# Altium PCB Main_PCB.PcbDoc (part 2 of 2)
Units mil, origin at the board's own origin, x right, y up, seen from the top; angles counter-clockwise.
Board outline 2322.83 x 1653.54 mil, 2 copper layers (Top Layer, Bottom Layer); 83 components, 50 nets, 238 pads, 64 vias.
Unrouted connection lines stored in the file: 5.
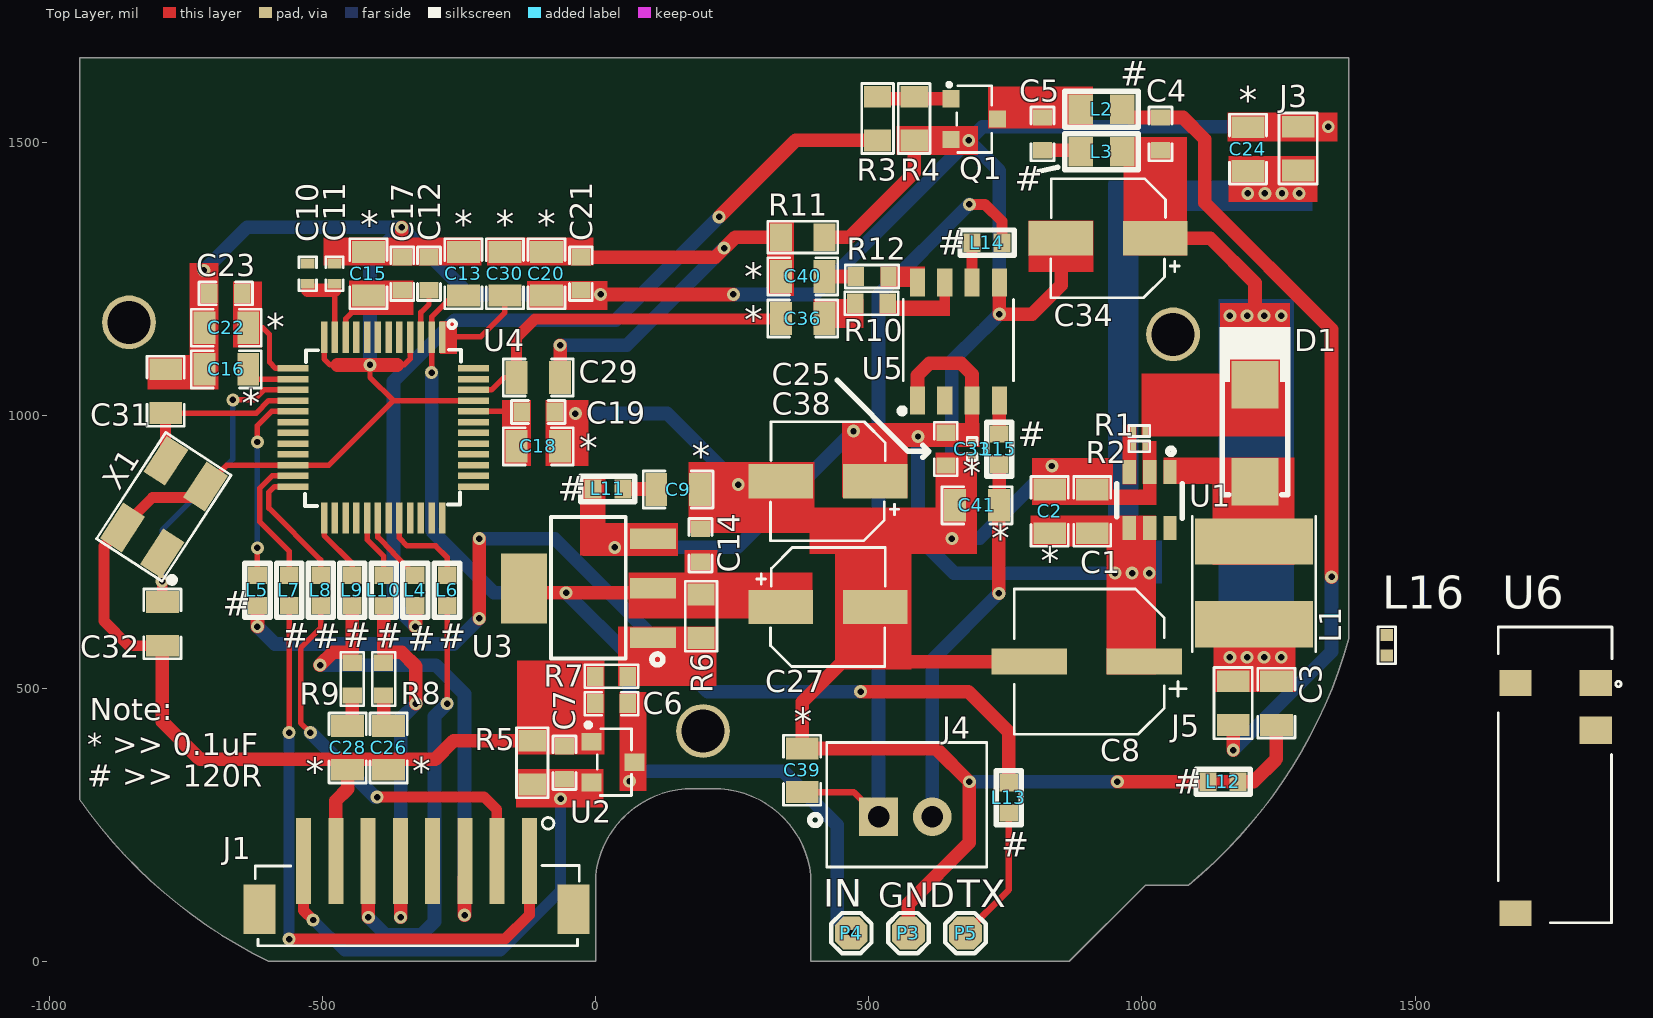
[diagram p0: Top Layer view]

## Part data (continued)
R10 R12: library part RC0603JR-0747KL, "RES SMD 47K OHM 5% 1/10W 0603", Case Code (Imperial)=0603, Case Code (Metric)=1608, Manufacturer=Yageo, Max Operating Temperature=155°C, Min Operating Temperature=-55°C, Package Quantity=5000, Power Rating=100mW, Resistance=47kR, Temperature Coefficient=100ppm/°C, Tolerance=5%, Voltage Rating=50V, Case/Package=0603, ComponentLink1Description=http://www.farnell.com/datasheets/443971.pdf, ComponentLink1URL=http://www.farnell.com/datasheets/443971.pdf, ComponentLink2Description=http://www.mouser.com/catalog/specsheets/RC0603.pdf, ComponentLink2URL=http://www.mouser.com/catalog/specsheets/RC0603.pdf, Composition="Thick Film", Depth=0.8mm, Height=0.45mm, Lead Free="Lead Free", Length=1.6mm, Manufacturer Part Number=RC0603JR-0747KL, Military Standard=Not, Number of Pins=2, Packaging="Tape and Reel", Pricing 1="5000=0.0025, 10000=0.0022, 25000=0.0019, 1=0.0011, 6000=0.001 (USD)", REACH SVHC="No SVHC", Stock 1=599135, Supplier 1=Arrow, Supplier Part Number 1=RC0603JR-0747KL, Termination=SMD/SMT, Voltage Rating (DC)=50V, Width=0.8mm
R11: library part RC0805FR-070RL, "Res Thick Film 0805 0 Ohm Epoxy Pad SMD T/R", Case Code (Imperial)=0805, Case Code (Metric)=2012, Manufacturer=Yageo, Max Operating Temperature=155°C, Max Power Dissipation=125mW, Min Operating Temperature=-55°C, Resistance=0mR, Resistor Type="Thick Film", Tolerance=1%, Case/Package=0805, Category="Chip SMD Resistors", ComponentLink1Description=https://datasheet.ciiva.com/17042/rc0805-17042698.pdf?src-supplier=Future+Electronics, ComponentLink1URL=https://datasheet.ciiva.com/17042/rc0805-17042698.pdf?src-supplier=Future+Electronics, ComponentLink2Description=https://datasheet.ciiva.com/15189/getdatasheetpartid-348154-15189885.pdf?src-supplier=Verical, ComponentLink2URL=https://datasheet.ciiva.com/15189/getdatasheetpartid-348154-15189885.pdf?src-supplier=Verical, Construction=Rectangular, Contact Plating=Tin,Matte, Depth=1.25mm, Features="Moisture Resistant", Lead Free="Lead Free", Length=2mm, Manufacturer Part Number=RC0805FR-070RL, Military Standard=Not, Number of Terminations=2, Packaging="Tape and Reel", Power Rating=125mW, Pricing 1="5000=0.00285, 10000=0.00281, 20000=0.00273, 30000=0.00267, 40000=0.00257, 50000=0.00251, 500000=0.00245 (USD)", Radiation Hardening=No, RoHS=Yes, RoHS Compliant=Yes, Series=RC, Size Code=0805, Stock 1=320000, Supplier 1=Avnet, Supplier Part Number 1=RC0805FR-070RL
U1: "24V 2A SOT-23-6 DC-DC Converters RoHS", Manufacturer=SHOUDING, Package=SOT-23-6, ComponentLink1Description="Supplier link", ComponentLink1URL=https://lcsc.com/product-detail/DC-DC-Converters_SDB628_C77805.html, Manufacturer Part No=SDB628
U2: "IC REG LINEAR 3.3V 200MA SOT23", Case/Package=TO-236-3, Dropout Voltage=680mV, Manufacturer=Torex, Max Input Voltage=6V, Max Operating Temperature=85°C, Max Supply Current=3uA, Min Operating Temperature=-40°C, Min Output Voltage=3.3V, Output Current=200mA, Category="Voltage Regulators - Linear", ComponentLink1Description=https://www.torexsemi.com/file/xc6206/XC6206.pdf?src-supplier=Digi-Key, ComponentLink1URL=https://www.torexsemi.com/file/xc6206/XC6206.pdf?src-supplier=Digi-Key, Manufacturer Part Number=XC6206P332MR-G, Mount="Surface Mount", Number of Regulators=1, Output Configuration=Positive, Output Type=Fixed, Pricing 1="3000=0.23146, 6000=0.22820, 12000=0.22168, 18000=0.21679, 24000=0.20864, 30000=0.20375, 300000=0.19886 (USD)", Quiescent Current=3uA, RoHS=Yes, RoHS Compliant=Yes, Supplier 1=Avnet, Supplier Part Number 1=XC6206P332MR-G
U3: "PMIC - LDO voltage regulator Texas Instruments LM1117MPX-ADJ/NOPB Positivbe, adjustable SOT 223", Case/Package=SOT-223, Current Rating=800mA, Dropout Voltage=1.2V, Manufacturer="TI National Semiconductor", Max Input Voltage=15V, Max Operating Temperature=125°C, Max Output Voltage=13.8V, Max Supply Current=10mA, Min Input Voltage=2.6V, Min Operating Temperature=0°C, Min Output Voltage=1.25V, Output Voltage Accuracy=1%, Package Quantity=2000, Power Supply Rejection Ratio (PSRR)=75dB, Quiescent Current=5mA, Reference Voltage=1.262V, Supplier Part Number 1=926-LM1117MPXADJNOPB, Accuracy=1%, Category="Voltage Regulators - Linear", ComponentLink1Description=https://datasheet.ciiva.com/15111/getdatasheetpartid-55626-15111244.pdf?src-supplier=Verical, ComponentLink1URL=https://datasheet.ciiva.com/15111/getdatasheetpartid-55626-15111244.pdf?src-supplier=Verical, ComponentLink2Description=https://datasheet.ciiva.com/3223/lm1117-n-3223530.pdf?src-supplier=Avnet, ComponentLink2URL=https://datasheet.ciiva.com/3223/lm1117-n-3223530.pdf?src-supplier=Avnet, ComponentLink3Description=https://datasheet.ciiva.com/3223/lm1117-n-3223531.pdf?src-supplier=Avnet, ComponentLink3URL=https://datasheet.ciiva.com/3223/lm1117-n-3223531.pdf?src-supplier=Avnet, ComponentLink4Description=https://datasheet.ciiva.com/6596/lm1117-n-6596777.pdf?src-supplier=Digi-Key, ComponentLink4URL=https://datasheet.ciiva.com/6596/lm1117-n-6596777.pdf?src-supplier=Digi-Key, ComponentLink5Description=https://datasheet.ciiva.com/6596/lm1117-n-6596778.pdf?src-supplier=Digi-Key, ComponentLink5URL=https://datasheet.ciiva.com/6596/lm1117-n-6596778.pdf?src-supplier=Digi-Key, ComponentLink6Description=https://datasheet.ciiva.com/6596/lm1117-n-6596779.pdf?src-supplier=Digi-Key, ComponentLink6URL=https://datasheet.ciiva.com/6596/lm1117-n-6596779.pdf?src-supplier=Digi-Key, ComponentLink7Description=https://datasheet.ciiva.com/25980/lm1117-n-25980333.pdf?src-supplier=Avnet+Europe, ComponentLink7URL=https://datasheet.ciiva.com/25980/lm1117-n-25980333.pdf?src-supplier=Avnet+Europe, ComponentLink8Description=https://datasheet.ciiva.com/22710/lm1117-n-22710935.pdf?src-supplier=Element14, ComponentLink8URL=https://datasheet.ciiva.com/22710/lm1117-n-22710935.pdf?src-supplier=Element14, Contact Plating=Tin,Matte, Lead Free="Lead Free", Manufacturer Part Number=LM1117MPX-ADJ/NOPB, Max Output Current=800mA, Min Current Limit=800mA, Mount="Surface Mount", Number of Outputs=1, Number of Pins=4, Number of Regulators=1, Output Configuration=Positive, Output Current=800mA, Output Type=Adjustable, Output Voltage=13.8V, Packaging="Tape and Reel", Polarity=Positive, Pricing 1="1=1.28000, 10=1.15000, 50=1.09000, 100=0.89500, 1000=0.58400, 10000=0.53200 (USD)", Radiation Hardening=No, REACH SVHC="No SVHC", RoHS=Yes, Series=-, Stock 1=273, Supplier 1=Mouser
U4: "High Performance 32-bit Bluetooth Audio P", Manufacturer="MV Silicon", Package=LQFP48, Pitch=0.5mm
U5: "Class D, Class AB 1-Channel (Mono) 11W x 1 @ 4Ω, 9W x 1 @ 4Ω 3V ~ 9V SOP-8_EP_150mil Audio Power OpAmps RoHS", Manufacturer=Manufacturer, Max Output Power x Channels @ Load="11W x 1 @ 4Ω, 9W x 1 @ 4Ω", Package=SOP-8_EP_150mil, Voltage - Supply="3V ~ 9Vv", Features="Overcurrent Protection, Thermal, Undervoltage Protection", Output Type="1-Channel (Mono)", Type="Class D, Class AB"
U6: "RF ANT 2.4GHZ STAMPED MET SLD", Manufacturer=Proant, Supplier Part Number 1=1532-1001-6-ND, ComponentLink1Description=https://media.digikey.com/pdf/Data%20Sheets/Proant%20PDF's/PRO-OB-440_Dwg.PDF?src-supplier=Digi-Key, ComponentLink1URL=https://media.digikey.com/pdf/Data%20Sheets/Proant%20PDF's/PRO-OB-440_Dwg.PDF?src-supplier=Digi-Key, ComponentLink2Description=http://www.proant.se/files/user/Application%20note%20-%20OnBoard%20SMD%20GNSS%20rev%202.0.pdf?src-supplier=Digi-Key, ComponentLink2URL=http://www.proant.se/files/user/Application%20note%20-%20OnBoard%20SMD%20GNSS%20rev%202.0.pdf?src-supplier=Digi-Key, ComponentLink3Description=http://www.proant.se/files/user/Documents/Datasheet%20-%20OnBoard%20SMD%202400%20MHz%20rev%203.pdf?src-supplier=Digi-Key, ComponentLink3URL=http://www.proant.se/files/user/Documents/Datasheet%20-%20OnBoard%20SMD%202400%20MHz%20rev%203.pdf?src-supplier=Digi-Key, Manufacturer Part Number=PRO-OB-440, Mount="Surface Mount", Number of Bands=1, Packaging="Cut Tape", Pricing 1="1=0.74, 10=0.647, 25=0.608, 100=0.4964, 250=0.46104, 500=0.39238 (USD)", Return Loss=-10dB, Stock 1=23502, Supplier 1=Digi-Key, Termination=Solder
X1: library part 7I24000F20UCG, "24MHz ±20ppm 20pF 40Ω SMD-5032_4P Crystals RoHS", ESR (Equivalent Series Resistance)=40Ω, Frequency Tolerance=±20ppm, Load Capacitance=20pF, Manufacturer="SJK(SHENZHEN CRYSTAL TECH)", Operating Temperature=-40℃~+85℃, Package=SMD-5032_4P, Crystal Type="Passive SMD Crystal", Frequency=24MHz

## Free pads (board coordinates)
  round 98.43 hole 78.74 unplated: MH1(-854,1170) MH2(1057,1148) MH3(196.59,422)

## Via types
v1: diameter 23.62, hole 11.81, Top Layer to Bottom Layer, 64 vias

## Nets (pads, with @x,y where several pads share a name; then routed paths per layer and width w, separated by ;. In a path a pad name is that pad's centre, name@x,y a point inside that pad or via, vN(x,y) a via of type N, cw(c..) or ccw(c..) an arc to the next point about the centre after c; other vN are vias at no path point)
3V3: C7.1 J1.8 R5.2 U2.2 | length 806.8
  Top Layer w20: J1.8 -534.69,93.69 v1(-517,76)
  Bottom Layer w20: v1(-517,76) -460,19 -174,19 -64,129 v1(-64,298)
ADJ: R6.2 R7.2 U3.1 | length 88
  Top Layer w25: U3.1 192.55,592.45 R6.2
ANT: C11.1 L16.2 U4.11 | length 135.4
  Top Layer w10: -478,1229 -477.35,1228.35 U4.11
  Top Layer w25: -527,1229 -478,1229
AVD33: C20.1 C21.1 C29.1 C30.1 C40.1 R11.2 | length 814.1
  Top Layer w25: C29.1 v1(-65,1128) ; C21.1 219,1289 256,1326 R11.2
  Bottom Layer w25: v1(-65,1128) 57,1128 v1(235,1306)
B_LED: J1.2 L8.1 | length 769.9
  Top Layer w10: v1(-522,419) -540,437 -540,574 -503.33,610.67 L8.1
  Top Layer w20: v1(-400,301) -204,301 -181,278 J1.2@-181,162
  Bottom Layer w25: v1(-522,419) -404,301 v1@-401,301
D_IN: C5.2 L2.2 Q1.3 | length 160.1
  Top Layer w25: Q1.3 738.32,1545 C5.2 872.97,1545 L2.2
FB: R1.1 R2.1 U1.3
GND: C1.2 C2.2 C3.2 C6.2 C7.2 C8.2 C9.2 C10.2 C11.2 C12.1 C13.2 C14.2 C15.2 C16.1 C17.2 C18.2 C19.2 C20.2 C21.2 C22.2 C23.2 C24.2 C25.2 C26.2 C27.2 C28.2 C31.1 C32.1 C33.2 C34.2 C38.2 C39.2 C41.2 J1.7 J3.2 L12.1 L12.2 P3.1 Q1.2 R2.2 R4.2 R5.1 R7.1 R11.1 U1.2 U2.1 U4.4 U4.12 U4.22 U4.45 U5.5 U6.1 X1.2 X1.4 | length 8857.7
  Top Layer w10: X1.2 -674.98,908.53 U4.22 -488.47,908.53 -370.36,1026.64 ; U4.12 -497.03,1103.03 -486,1092 -473,1092 ; v1(-413,1092) -413,1069.28 -370.36,1026.64 ; -363.58,1092 -350.58,1092 -339.55,1103.03 U4.4 ; U4.45 -370.36,1026.64
  Top Layer w20: C32.1 -855,578 -900,623 -900,760.49 X1.4 -811.49,849 X1.2@-717,849
  Top Layer w25: C32.1 -793,439 -724,370 C28.2@-454,370 ; J1.7 -475.64,294.36 -454,316 C28.2@-454,370 ; -473,1092 v1(-413,1092) -363.58,1092 ; v1(-355,1344) -355,1290 C17.2 ; R5.1 -260,404 -294,370 -379,370 C28.2@-454,370 ; v1(9,1221) v1(252,1221) ; R11.1 465,1326 583,1444 R4.2 ; 469,566 378,475 C39.2 623,390 v1(684,329) 684,218 572.5,106.5 P3.1 ; C27.2 511.61,610.39 573,549 C8.2 ; C41.2@641,852 C41.2 ; U5.5 v1(739,1185) 799,1185 852,1238 852,1275 ; v1(955,329) L12.1 L12.2 1204,329 1246,371 C3.2 ; 1014,856 U1.2 ; J3.2@1285,1527 J3.2
  Bottom Layer w25: v1(-717,1265) -638,1344 v1(-355,1344) ; v1(-413,1092) -413,1286 v1(-355,1344) ; v1(-37,1003) 131,1003 v1(261,873) ; v1(9,1221) -232,1221 v1(-355,1344) ; v1(252,1221) 401,1221 v1(683,1503) ; v1(652,774) v1@652,775 ; 681,1127 v1(739,1185) 739,1447 v1(683,1503) ; v1(684,329) v1(955,329) ; 705,1152 652,1099 v1@652,775 ; v1(835,907) 703,775 v1@652,775 ; v1(1341,1528) 708,1528 v1(683,1503)
IN+: C29.2 C36.1 U4.46 | length 659.8
  Top Layer w10: U4.46 -190.68,1046.32 -168,1069 C29.2
  Top Layer w20: C29.2 -145,1142 -111,1176 339,1176 C36.1
LDO_IN: C6.1 C13.1 C14.1 C27.1 P4.1 R6.1 U2.3 U3.2 U3.4 U4.2 | length 2150.7
  Top Layer w10: v1(-300.18,1078) U4.2 -300.18,1179.82 -261,1219 C13.1
  Top Layer w25: U3.4 -123.17,675 v1(-54,675) 97.17,675 U3.2 R6.1@192,683 ; C27.1@315.39,672 C27.1
  Bottom Layer w25: v1(-300.18,1078) -300.18,789.18 -186,675 v1(-54,675) 62,559 v1(62,330) 80,348 344,348 442,250 442,78 v1(468,52)
LED_EN: L4.1 U4.30 | length 133.6
  Top Layer w10: U4.30 -398.59,776.63 -370.67,748.71 -370.67,747.72 L4.1
LED_GND: C4.2 J5.2 L2.1 | length 1508.4
  Top Layer w25: L2.1 979.03,1545 C4.2 1075,1545 1115,1505 1115,1389 1347,1157 v1(1347,704) ; v1(1167,387) J5.2
  Bottom Layer w25: v1(1167,387) 1347,567 v1(1347,704)
LED_IN: C3.1 C4.1 C34.1 D1.2 J5.1 L1.2 L3.1 R1.2 | length 700.8
  Top Layer w25: L3.1 967.03,1485 C4.1@1035,1485 ; 1013,1007 1013,1027 1041.58,1055.58 D1.2 1207,1242 1125,1324 C34.1
  other v1: 1161,557 1192.33,557 1223.67,557 1255,557 1161,1182 1192.33,1182 1223.67,1182 1255,1182
NetC5_1: C5.1 L3.2 | length 71.2
  Top Layer w25: C5.1 884.97,1485 L3.2
NetC9_1: C9.1 L11.2 | length 61.3
  Top Layer w25: L11.2 110,865 C9.1
NetC10_1: C10.1 L16.1 U6.2
NetC12_2: C12.2 U4.3 | length 92.3
  Top Layer w10: U4.3 -319.87,1188.13 -305,1203 C12.2
NetC16_2: C16.2 U4.14 | length 89.3
  Top Layer w10: C16.2 -618.01,1066.01 U4.14
NetC26_1: C26.1 R8.1 | length 54
  Top Layer w25: C26.1@-388,433 R8.1
NetC28_1: C28.1 R9.1 | length 53
  Top Layer w25: C28.1@-445.5,434 R9.1
NetC30_2: C30.2 U4.1 | length 140.2
  Top Layer w10: -257,1144 -210,1144 -166,1188 C30.2
NetC36_2: C36.2 R10.2
NetC40_2: C40.2 R12.2 | length 57
  Top Layer w25: C40.2 R12.2
NetL4_2: L4.2 R3.2 | length 1572.7
  Top Layer w25: v1(-329.83,613.17) L4.2 ; v1(226,1363) 366,1503 R3.2
  Bottom Layer w25: v1(-329.83,613.17) -370,653.33 -370,1062 -258,1174 37,1174 v1(226,1363)
NetL5_2: L5.2 U4.17 | length 349.6
  Top Layer w10: L5.2 v1(-619,757) ; v1(-619,951) -619,981 -593.05,1006.95 U4.17
  Bottom Layer w10: v1(-619,757) v1(-619,951)
NetL6_1: L6.1 U4.32 | length 171.7
  Top Layer w10: U4.32 -359.22,775.22 -345,761 -293,761 -272,740 L6.1
NetL7_2: L7.2 U4.23 | length 251.6
  Top Layer w10: L7.2 -561.17,751.17 -615,805 -615,866.04 -592.2,888.84 U4.23
NetL8_2: L8.2 U4.24 | length 239.2
  Top Layer w10: U4.24 -587.84,869.16 -598,859 -598,830 -503.33,735.33 L8.2
NetL9_2: L9.2 U4.25 | length 126.3
  Top Layer w10: U4.25 -497,780 -445.5,728.5 L9.2
NetL10_2: L10.2 U4.29 | length 117.7
  Top Layer w10: U4.29 -418.28,772.28 -387.67,741.67 L10.2
NetL13_2: L13.2 P5.1 | length 252.7
  Top Layer w12: P5.1 756,131 L13.2
NetL14_1: L14.1 U5.6 | length 72.8
  Top Layer w20: L14.1 689,1315.88 U5.6
NetL15_1: L15.1 U5.4 | length 61.2
  Top Layer w25: L15.1 U5.4
NetQ1_1: Q1.1 R3.1 R4.1 | length 136.2
  Top Layer w25: R3.1 519.59,1579.41 Q1.1
NetR10_1: R10.1 U5.7 | length 50.6
  Top Layer w20: R10.1@535,1200.68 R10.1 ; 639,1197 U5.7
NetR12_1: R12.1 U5.8 | length 57.4
  Top Layer w20: R12.1 578.27,1254 U5.8
PLAY_KEY: J1.6 L6.2 | length 835.3
  Top Layer w10: v1(-272,472) L6.2
  Top Layer w25: v1(-416.06,81) J1.6@-416.06,183.76
  Bottom Layer w25: v1(-416.06,81) -384.06,49 -319,49 -295,73 -295,449 v1(-272,472)
RF3V3: C22.1 C23.1 U4.13 | length 142.5
  Top Layer w10: C22.1 -609,1160 -597,1148 -597,1097 -585.69,1085.69 U4.13
SPK_N: C41.1 J4.2 L15.2 | length 696.2
  Top Layer w25: v1(738,674) C41.1 739,836 L15.2
  Bottom Layer w25: J4.2 616.21,552.21 v1(738,674)
SPK_P: C39.1 J4.1 L14.2 | length 1460.1
  Top Layer w12: C39.1 472.79,310 J4.1
  Top Layer w20: v1(684,1386) 713,1386 744,1355 L14.2
  Bottom Layer w25: J4.1 517.79,1219.79 v1(684,1386)
SW: D1.1 L1.1 U1.1
T_LED1: J1.1 L7.1 | length 1167.7
  Top Layer w10: v1@-561.17,419.17 L7.1
  Top Layer w20: v1(-561.17,41) -166,41 -121.31,85.69 J1.1
  Bottom Layer w20: v1(-561.17,41) v1(-561.17,419)
TCH_TX: L5.1 L13.1 | length 1829.4
  Top Layer w25: v1(-619,613.17) L5.1@-619,649.39 ; v1(-213,628) v1(-213,774) ; v1(485,494) 682,494 756,420 L13.1
  Bottom Layer w25: v1(-619,613.17) -587,581.17 -259.83,581.17 v1(-213,628) ; v1(-213,774) -75,774 205,494 v1(485,494)
TKEY1: J1.3 L9.1 R9.2 | length 914.3
  Top Layer w25: v1(-504.49,542.51) -481,566 -445.5,566 L9.1 ; v1(-240,85) -240,152 J1.3@-239,153
  Bottom Layer w25: v1(-504.49,542.51) -292.51,542.51 -239.95,489.95 -239.95,85.05 v1(-240,85)
TKEY2: J1.5 L10.1 R8.2 | length 729.9
  Top Layer w25: L10.1 -387.67,566.33 -388,566 -355,566 -329,540 v1(-329,472) ; J1.5 -357,183.76 v1(-357,81)
  Bottom Layer w25: v1(-357,81) -357,444 v1(-329,472)
VDD_3V3: C15.1 C17.1 U4.10 | length 93.4
  Top Layer w10: U4.10 -457.66,1176.34 -416,1218 C15.1
VIN: C1.1 C2.1 C8.1 C24.1 C25.1 C33.1 C38.1 J3.1 L11.1 U1.4 U1.5 U3.3 U5.1 U5.3 | length 1378.3
  Top Layer w25: U5.1 589,1073 611,1095 669,1095 689,1075 U5.3 689,959 ; C24.1 C24.1@1195,1448
  Bottom Layer w25: v1(35,758) 259,758 v1(472,971) ; v1(590,961) 590,777 656,711 v1(950.67,711)
  other v1: 982,711 1013.33,711 1193.67,1406 1225,1406 1256.33,1406 1287.67,1406
VMID: C18.1 C19.1 U4.44 | length 88.7
  Top Layer w10: U4.44 -135.95,1006.95 C19.1
XI: C32.2 U4.15 X1.1 | length 541.2
  Top Layer w10: v1(-664,1028) -625.03,1028 -606.71,1046.32 U4.15
  Top Layer w20: v1@-793.35,696.04 -793.35,658.35 C32.2
  Bottom Layer w10: v1(-793.63,696.04) -793.63,789.88 -664,919.51 v1(-664,1028)
XO: C31.2 U4.16 X1.3 | length 329.7
  Top Layer w10: C31.2 -621,1004 -598.36,1026.64 U4.16
  Top Layer w20: C31.2 -787,917.02 X1.3
pads on no net: J1.4 J1.MP1 J1.MP2 U1.6 U4.5 U4.6 U4.7 U4.8 U4.9 U4.18 U4.19 U4.20 U4.21 U4.26 U4.27 U4.28 U4.31 U4.33 U4.34 U4.35 U4.36 U4.37 U4.38 U4.39 U4.40 U4.41 U4.42 U4.43 U4.47 U4.48 U5.2 U6.3 U6.4

## Other copper
Top Layer:
  rectangle net 3V3: -146,282 14,352
  rectangle net GND: -144,379 16,551
  rectangle net VIN: -29,743 18,886
  region net VIN: -24,802.55 -24,742.55 151,742.55 151,802.55
  rectangle net ADJ: 41,504 221,613
  rectangle net LDO_IN: 44,312 93,493
  region net LDO_IN: 397,628 397,712 60,712 60,628
  rectangle net LDO_IN: 163,648 223,753
  rectangle net GND: 438,535 578,812
  rectangle net GND: 391,746 698,831
  rectangle net GND: 170,784 401,914
  rectangle net GND: 799,836 947,922
  rectangle net GND: 801,836 1027,864
  rectangle net GND: 622,799 698,932
  rectangle net VIN: 451,849 571,986
  rectangle net VIN: 452,942 703,986
  rectangle net GND: 792,1262 911,1356
  rectangle net NetR10_1: 520,1181.68 649,1210
  rectangle net NetR12_1: 521,1235 603,1272
  rectangle net LED_IN: 1143,992 1271,1205
  rectangle net LED_IN: 1154,534.82 1180,614.82
  rectangle net LED_IN: 966,1292 1082,1509
  rectangle net LED_IN: 999,961 1271,1076
  rectangle net VIN: 935,525 1026,808
  region net SW: 1039,923 1039,874 1139,874 1139,923
  rectangle net GND: 1001,874 1027,953
  rectangle net FB: 964,873 990,983
  rectangle net VIN: 796,760 1026,816
  region net SW: 1279,726 1279,923 1129,923 1129,726
  region net LED_IN: 1131,660 1131,493 1281,493 1281,660
  region net GND: 1157,1554 1157,1501 1358,1501 1358,1554
  region net VIN: 1158,1474 1158,1390 1321,1390 1321,1474
  rectangle net D_IN: 718,1525 910,1602
  region net GND: 551,1529 551,1476 700,1476 700,1529
  region net GND: -126,1246 -126,1193 22,1193 22,1246
  rectangle net NetC30_2: -285,1112 -254,1172
  region net RF3V3: -611,1245 -664,1245 -664,1124 -611,1124
  region net GND: -820,1110 -820,1047 -690,1047 -690,1110
  region net GND: -690,1279 -743,1279 -743,1049 -690,1049
  region net VDD_3V3: -451,1247 -451,1183 -333,1183 -333,1247
  region net VMID: -118,1028 -171,1028 -171,907 -118,907
  rectangle net GND: -92,907 -13,1028
  rectangle net NetC36_2: 399,1160 490,1213
  region net AVD33: 314,1356 314,1218 363,1218 363,1356
  rectangle net AVD33: -199,1274 -4,1325
  rectangle net GND: -498,1274 -209,1325
Bottom Layer:
  region net VIN: 938,771 938,692 1037,692 1037,771
  region net VIN: 938,1426 938,692 994,692 994,1426
  rectangle net VIN: 939,1374 1312,1430
  rectangle net LED_IN: 1140,538 1278,1213

## Silkscreen, mask and mechanical layers (free items; w line width, h text height)
Top Overlay:
  lines w10: 442,1064 572,934 610,934 ; 599,923 610,934 ; 599,945 610,934 ; 810,1446 846,1454
  text "#" at 960,1603 h45
  text "*" at 1177,1552 h50
  text "#" at 767,1411 h45
  text "*" at -259,1325 h50
  text "*" at -183,1325 h50
  text "*" at -107,1325 h50
  text "*" at -431,1324 h50
  text "#" at 626,1294 h45
  text "*" at 272,1229 h50
  text "*" at 272,1150 h50
  text "*" at -603,1136 h50
  text "*" at -648,997 h50
  text "#" at 773,943 h45
  text "*" at -30,915 h50
  text "*" at 176,900 h50
  text "*" at 672,869 h50
  text "#" at -69,843 h45
  text "*" at 724,750 h50
  text "*" at 815,709 h50
  text "#" at -683,633 h45
  text "#" at -462,575 h45
  text "#" at -575,574 h45
  text "#" at -403,574 h45
  text "#" at -518,573 h45
  text "#" at -288,573 h45
  text "#" at -344,569 h45
  text "Note:" at -926,428 h70
  text "*" at 363,414 h50
  text "* >> 0.1uF" at -931,364.24 h70
  text "*" at -336,324 h50
  text "*" at -531,323 h50
  text "#" at 1058,307 h45
  text "# >> 120R" at -931,306.24 h70
  text "#" at 742,192 h45
  text "IN" at 417,100 h50
  text "GND" at 517,99 h45
  text "TX" at 662,99 h50
Bottom Overlay:
  drawing of 3074 lines, arcs and shapes, not listed
  text "ZERO CARBON FOOTPRINT" at 718,617 h38
Mechanical 2:
  circle w0.5: c-1465.47,629.99 r4.65
  circle w0.5: c-1699.36,629.99 r4.65
  circle w0.5: c-1582.42,546.05 r4.65
  lines w0.5: -1704.13,723.97 -1704.13,731.41 ; -1704.01,723.97 -1704.01,731.41 ; -1694.71,723.97 -1694.71,731.41 ; -1646.35,723.97 -1646.35,731.41 ; -1611.48,723.97 -1611.48,731.41 ; -1587.07,723.97 -1587.07,731.41 ; -1577.77,723.97 -1577.77,731.41 ; -1553.35,723.97 -1553.35,731.41 ; -1518.48,723.97 -1518.48,731.41 ; -1503.79,723.97 -1503.79,731.41 ; -1494.49,723.97 -1494.49,731.41 ; -1481.95,723.97 -1481.95,731.41 ; -1470.12,723.97 -1470.12,731.41 ; -1460.82,723.97 -1460.82,731.41 ; -1448.17,723.97 -1448.17,731.41 ; -1846.6,449.25 -1386.25,449.25 -1386.25,774.75 -1846.6,774.75 -1846.6,449.25 ; -1724.24,562.79 ccw(c-1582.42,618.22) -1704.13,526.72 ccw(c-1582.53,618.08) -1646.35,480.02 -1611.48,480.02 -1611.48,504.44 cw(c-1582.42,504.44) -1553.35,504.44 -1553.35,480.02 -1518.48,480.02 -1503.79,493.97 -1494.49,493.97 ccw(c-1583.52,619.53) -1481.95,503.88 ccw(c-1581.76,617.92) -1448.17,546.37 ccw(c-1582.42,618.27) -1440.59,562.79 -1440.59,684.62 -1724.24,684.62 -1724.24,562.79 ; -1724.24,723.97 -1440.59,723.97 -1440.59,731.41 -1724.24,731.41 -1724.24,723.97
  lines w10: -944,295.73 ccw(c-197.56,819.07) -598.72,0.46 -510.93,0.46 0.25,0.46 0.25,157.94 cw(c177.42,138.25) 179.09,316.5 214.07,316.49 cw(c216.79,138.25) 393.95,157.94 393.95,0.46 867.02,0.46 1006.22,139.65 1084.96,139.65 ccw(c513.7,832.95) 1378.83,591.01 1378.83,1654 -944,1654 -944,295.73

## Dimensions
-1440,566 to -1440,683 on Mechanical 1
-1360,683 to -1553.35,480.02 on Mechanical 1
-1723,684 to -1440,684 on Mechanical 1